# Altium PCB semubot_lidar_driver.PcbDoc (part 2 of 2)
Units mm, origin at the board's own origin, x right, y up, seen from the top; angles counter-clockwise.
Board outline 115 x 110 mm, 4 copper layers (Top Layer, Inner 1, Inner 2, Bottom Layer), stack 1.564 mm thick; 114 components, 69 nets, 444 pads, 478 vias.
Unrouted connection lines stored in the file: 2.
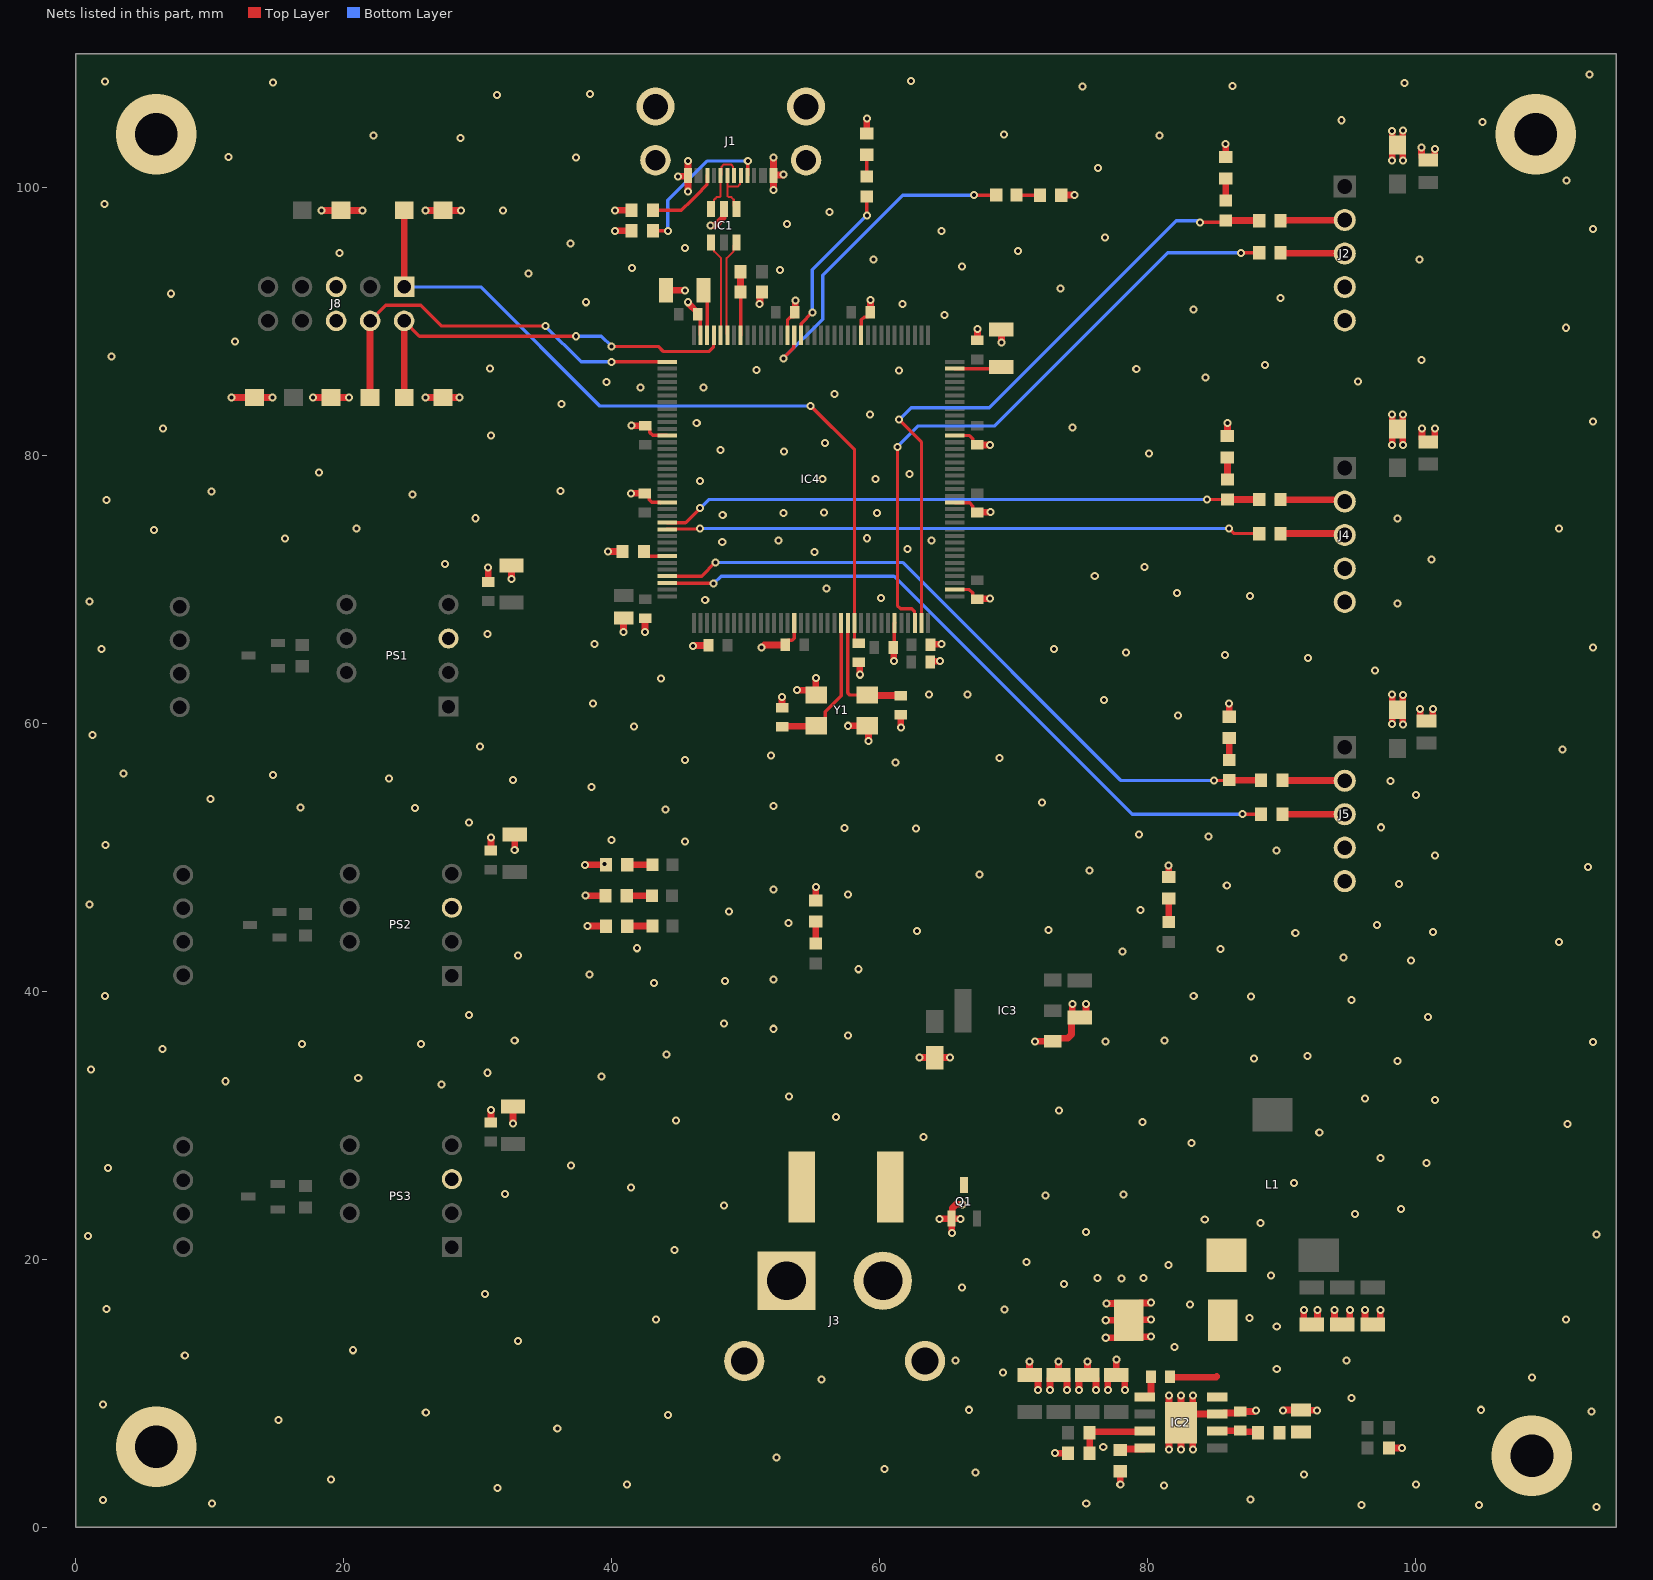
[diagram p4: the nets of this part, all layers, seen from the top]

## Via types
v1: diameter 0.6, hole 0.3, Top Layer to Bottom Layer, tented both sides, 474 vias
v2: diameter 6, hole 3.2, Top Layer to Bottom Layer, 4 vias

## Nets (pads, with @x,y where several pads share a name; then routed paths per layer and width w, separated by ;. In a path a pad name is that pad's centre, name@x,y a point inside that pad or via, vN(x,y) a via of type N, cw(c..) or ccw(c..) an arc to the next point about the centre after c; other vN are vias at no path point) (continued)
GND: C1.1 C2.1 C4.1 C5.1 C6.1 C7.1 C8.1 C9.1 C10.1 C11.1 C12.2 C13.1 C14.1 C15.1 C16.1 C17.1 C18.1 C19.1 C20.1 C21.1 C22.1 C23.1 C24.1 C25.1 C26.1 C27.1 C28.1 C29.1 C30.1 C31.1 C32.1 C33.1 C34.1 C35.1 C36.1 C37.1 C38.1 C39.1 C40.1 C41.1 C42.1 D1.1 D2.1 D3.2 D4.1 D8.1 D9.1 D10.1 D11.1 D12.1 IC1.2 IC2.7 IC2.9 IC3.1 IC4.16 IC4.31 IC4.38 IC4.51 IC4.61 IC4.83 IC4.94 IC4.107 IC4.120 IC4.130 J1.A1 J1.A12 J1.MH1 J1.MH2 J1.MH3 J1.MH4 J2.4 J2.5 J3.2 J3.MH1 J3.MH2 J4.4 J4.5 J5.4 J5.5 J8.5 J8.6 PS1.3 PS2.3 PS3.3 Q1.1 R3.1 R4.1 R11.1 R13.1 R14.1 R15.2 R16.2 R17.2 R18.2 R20.2 R21.2 R22.2 R23.2 R25.2 R26.2 R28.1 R30.1 Y1.2 Y1.4 | length 187.9
  Top Layer w0.25: C30.1@42.58,77.187 42.82,76.947 42.82,76.712 43.003,76.529 43.609,76.529 IC4.130@43.651,76.486 ; C29.1@42.617,82.229 42.857,81.989 42.857,81.731 43.06,81.529 44.123,81.529 IC4.120@44.148,81.504 ; C33.1@46.43,90.569 46.611,90.388 46.611,89.017 IC4.107@46.636,88.992 ; C31.1@52.956,65.977 53.196,66.217 53.472,66.217 53.636,66.381 IC4.16@53.636,67.516 ; IC4.94@53.136,88.992 53.136,90.145 53.342,90.351 53.561,90.351 53.801,90.591 C32.1@53.801,90.696 ; IC4.83@58.636,88.992 58.636,90.138 58.849,90.351 59.077,90.351 59.317,90.591 C23.1@59.317,90.696 ; C35.1@61.035,65.677 61.111,65.753 61.111,67.491 IC4.31@61.136,67.516 ; v1@61.061,64.687 v1(61.087,64.661) ; IC4.38@65.624,70.004 66.717,70.004 66.965,69.756 66.965,69.525 67.205,69.285 C26.1@67.31,69.285 ; IC4.51@65.624,76.504 65.649,76.479 66.729,76.479 66.965,76.243 66.965,76.002 67.205,75.762 C24.1@67.31,75.762 ; IC4.61@65.624,81.504 66.725,81.504 66.96,81.268 66.96,81.049 67.2,80.809 C25.1@67.305,80.809
  Top Layer w0.5: v1(11.614,84.342) D9.1@13.339,84.342 v1(14.662,84.342) ; v1(17.71,84.342) D12.1@19.054,84.342 v1(20.377,84.342) ; v1(18.345,98.312) D8.1@19.795,98.312 v1(21.393,98.312) ; v1(26.092,84.342) D11.1@27.415,84.342 v1(28.632,84.342) ; v1(26.092,98.312) D10.1@27.415,98.312 v1(28.759,98.312) ; C17.1@30.785,70.578 v1(30.785,71.646) ; C21.1@30.988,30.213 v1(30.988,31.154) ; C19.1@30.988,50.512 30.989,50.513 v1(30.991,51.477) v1(30.991,51.477) ; v1(32.526,70.799) C16.1@32.526,71.808 ; v1(32.639,30.138) C20.1@32.639,31.401 ; v1(32.766,50.564) C18.1@32.766,51.7 ; v1(37.996,49.425) 38.023,49.425 38.06,49.462 R21.2@39.567,49.462 ; v1(38.044,47.148) R22.2@39.53,47.148 ; v1(38.208,44.88) R23.2@39.567,44.88 ; v1(39.717,72.842) 39.72,72.844 40.817,72.844 R28.1@40.82,72.847 ; v1(40.259,96.792) R4.1@41.491,96.792 ; v1(40.259,98.316) R3.1@41.491,98.316 ; v1(40.894,66.82) C22.1@40.894,67.895 ; v1(41.436,77.184) 41.438,77.185 C30.1@42.475,77.187 C30.1@42.475,77.187 ; v1(41.485,82.237) 41.489,82.233 42.508,82.233 C29.1@42.512,82.229 ; v1(42.482,66.838) 42.497,66.853 42.497,67.854 C28.1@42.512,67.869 ; C39.1@44.076,92.347 v1(45.466,92.347) ; v1(44.958,100.856) 44.977,100.875 45.65,100.875 J1.A12@45.695,100.92 ; v1(45.72,91.458) 45.739,91.439 45.739,91.365 46.43,90.674 C33.1@46.43,90.569 ; v1(45.72,99.713) 45.708,99.726 45.708,100.907 J1.A12@45.695,100.92 ; v1(45.72,101.999) 45.708,101.987 45.708,100.933 J1.A12@45.695,100.92 ; v1(46.091,65.804) 46.11,65.823 47.205,65.823 C27.1@47.228,65.847 ; v1(47.371,97.173) 47.39,97.192 47.743,97.192 48.337,97.787 48.337,98.373 IC1.2@48.387,98.423 ; v1(51.054,91.331) 51.073,91.35 51.073,92.074 R30.1@51.219,92.22 ; v1(51.181,65.677) 51.208,65.677 51.403,65.872 C31.1@52.956,65.872 ; v1(52.07,99.84) 52.083,99.853 52.083,100.908 J1.A1@52.095,100.92 ; v1(52.07,102.253) 52.083,102.24 52.083,100.933 J1.A1@52.095,100.92 ; v1(52.705,61.994) 52.716,61.983 52.716,61.194 C41.1@52.727,61.184 ; v1(52.832,100.983) 52.813,100.964 52.139,100.964 J1.A1@52.095,100.92 ; C32.1@53.669,90.696 53.702,90.729 53.702,91.566 v1(53.721,91.585) ; v1(53.848,62.502) 53.867,62.483 54.92,62.483 Y1.4@55.272,62.132 55.245,62.158 v1(55.245,63.391) ; R25.2@55.245,46.804 v1(55.245,47.782) ; v1(57.658,59.835) 57.66,59.833 59.07,59.833 Y1.2@59.072,59.832 59.182,59.721 v1(59.182,58.692) ; C40.1@58.466,64.582 58.528,64.52 58.528,63.664 v1(58.547,63.645) ; R20.2@59.055,104.069 v1(59.055,105.174) ; C23.1@59.317,90.696 59.33,90.709 59.33,91.615 v1(59.343,91.628) ; C35.1@61.035,65.677 61.068,65.644 61.068,64.68 v1(61.087,64.661) ; v1(61.595,59.708) C42.1@61.595,60.649 ; v1(62.992,35.07) 64.106,35.07 C12.2@64.123,35.053 64.14,35.07 v1(65.278,35.07) ; C36.1@63.799,64.595 63.846,64.642 64.497,64.642 v1(64.516,64.661) ; C37.1@63.809,65.872 63.848,65.912 64.624,65.912 v1(64.643,65.931) ; v1(64.498,23.007) 64.514,23.023 65.364,23.023 Q1.1@65.374,23.033 ; v1(65.405,21.953) 65.39,21.968 65.39,23.017 Q1.1@65.374,23.033 ; v1(66.065,23.019) 66.058,23.026 65.381,23.026 Q1.1@65.374,23.033 ; v1(66.2,24.099) 66.198,24.097 65.717,24.097 65.424,23.804 65.424,23.083 Q1.1@65.374,23.033 ; C25.1@67.305,80.809 67.31,80.804 68.24,80.804 v1(68.245,80.798) ; C26.1@67.31,69.285 67.344,69.319 68.249,69.319 v1(68.268,69.338) ; C24.1@67.31,75.762 67.321,75.773 68.278,75.773 v1(68.29,75.785) ; C34.1@67.31,88.612 67.319,88.621 67.319,89.434 v1(67.328,89.443) ; C38.1@69.088,89.412 69.108,89.392 v1(69.108,88.444) ; C9.1@70.847,11.36 C9.1@71.207,11.36 ; v1(71.207,12.383) C9.1@71.207,11.36 ; v1(71.616,36.276) 71.618,36.274 72.932,36.274 IC3.1@72.934,36.272 73.159,36.497 74.039,36.497 74.332,36.79 74.332,37.775 C13.1@74.607,38.05 ; v1(71.842,10.224) 71.842,11.085 71.567,11.36 C9.1@71.207,11.36 ; v1(72.731,10.224) 72.731,11.085 73.006,11.36 C11.1@73.366,11.36 ; v1(73.112,5.525) R13.1@74.09,5.525 ; v1(73.366,12.383) C11.1@73.366,11.36 ; R15.2@73.571,99.459 v1(74.549,99.459) ; v1(74.001,10.224) 74.001,11.085 73.726,11.36 C11.1@73.366,11.36 ; v1(74.396,39.073) 74.396,38.325 C13.1@74.671,38.05 ; v1(74.89,10.224) 74.89,11.085 75.165,11.36 C10.1@75.525,11.36 ; C13.1@74.958,38.05 75.151,38.05 75.426,38.325 v1(75.426,39.07) ; v1(75.525,12.383) C10.1@75.525,11.36 ; v1(76.16,10.224) 76.16,11.085 75.885,11.36 C10.1@75.525,11.36 ; v1(76.895,14.14) 77.779,14.14 78.629,14.99 D3.2@78.629,15.431 ; v1(76.895,15.447) 78.613,15.447 D3.2@78.629,15.431 ; v1(76.934,16.695) 77.779,16.695 D3.2@78.629,15.845 ; v1(77.049,10.224) 77.049,11.085 77.324,11.36 C8.1@77.684,11.36 ; v1(77.684,12.51) C8.1@77.684,11.36 ; R14.1@77.963,4.171 77.971,4.164 77.971,3.182 v1(77.978,3.175) ; v1(78.319,10.224) 78.319,11.085 78.044,11.36 C8.1@77.684,11.36 ; D3.2@78.629,15.881 79.479,16.731 79.929,16.731 79.94,16.742 80.259,16.742 v1(80.279,16.761) ; v1(80.279,14.221) 79.479,14.221 78.629,15.071 D3.2@78.629,15.431 ; v1(80.279,15.491) 78.689,15.491 D3.2@78.629,15.431 ; R26.2@81.597,48.544 v1(81.597,49.395) ; v1(81.621,5.779) 81.621,6.922 IC2.9@82.51,7.811 ; v1(81.621,9.843) 81.621,8.7 IC2.9@82.51,7.811 ; v1(82.51,5.779) IC2.9@82.51,7.811 ; v1(82.51,9.843) IC2.9@82.51,7.811 ; v1(83.399,5.779) 83.399,6.922 IC2.9@82.51,7.811 ; v1(83.399,9.843) 83.399,8.7 83.209,8.51 83.272,8.446 85.66,8.446 85.731,8.518 86.825,8.518 C14.1@86.955,8.648 ; R17.2@85.852,102.291 v1(85.852,103.269) ; R16.2@85.979,81.463 v1(85.979,82.441) ; R18.2@86.106,60.508 v1(86.106,61.486) ; C14.1@86.951,8.631 86.953,8.633 88.004,8.633 88.071,8.7 v1(88.098,8.7) ; v1(90.13,8.7) 90.157,8.7 90.208,8.751 C15.1@91.469,8.751 91.501,8.719 92.651,8.719 v1(92.67,8.7) ; v1(91.686,16.197) 91.686,15.403 91.961,15.128 C4.1@92.262,15.128 92.427,15.128 92.702,15.403 v1(92.702,16.197) ; v1(93.972,16.197) 93.972,15.403 94.273,15.403 C5.1@94.548,15.128 94.84,15.128 95.115,15.403 v1(95.115,16.197) ; v1(96.258,16.197) 96.258,15.403 96.533,15.128 C6.1@96.834,15.128 97.126,15.128 97.401,15.403 v1(97.401,16.197) ; R11.1@98.023,5.887 R11.1@98.042,5.906 v1(99.02,5.906) ; v1(98.256,80.799) 98.256,80.826 98.279,80.848 98.279,81.594 D2.1@98.679,81.994 ; v1(98.257,83.083) 98.277,83.064 98.277,82.736 98.279,82.734 98.279,82.394 D2.1@98.679,81.994 ; v1(98.258,62.185) 98.278,62.166 98.278,61.772 98.279,61.771 98.279,61.431 D4.1@98.679,61.031 ; v1(98.26,102.041) 98.26,102.068 98.279,102.088 98.279,102.795 D1.1@98.679,103.195 ; v1(98.261,59.97) 98.28,59.989 98.28,60.632 D4.1@98.679,61.031 ; v1(98.263,104.256) 98.282,104.237 98.282,103.592 D1.1@98.679,103.195 ; 99.08,102.349 99.08,102.044 v1(99.099,102.025) ; 99.079,102.349 99.079,102.795 D1.1@98.679,103.195 ; v1(99.092,104.287) 99.073,104.268 99.073,103.589 D1.1@98.679,103.195 ; v1(99.093,83.073) 99.074,83.053 99.074,82.389 D2.1@98.679,81.994 ; v1(99.096,62.14) 99.076,62.121 99.076,61.428 D4.1@98.679,61.031 ; v1(99.095,80.811) 99.076,80.83 99.076,81.597 D2.1@98.679,81.994 ; v1(99.098,59.941) 99.098,59.968 99.079,59.987 99.079,60.631 D4.1@98.679,61.031 ; v1(100.355,61.08) 100.374,61.06 100.374,60.432 100.403,60.432 100.638,60.197 C7.1@100.848,60.197 101.08,60.197 101.315,60.432 101.315,61.07 v1(101.335,61.089) ; v1(100.457,103.015) 100.476,102.996 100.476,102.556 100.48,102.552 100.48,102.302 100.715,102.067 C1.1@100.965,102.067 101.215,102.067 101.45,102.302 101.45,102.552 101.454,102.556 101.454,102.869 v1(101.473,102.888) ; v1(100.504,82.035) 100.504,81.258 100.739,81.023 C2.1@100.975,81.023 101.219,81.023 101.454,81.258 v1@101.454,82.041
  other v1: 113.522,1.509 96.007,1.648 104.775,1.651 10.16,1.778 75.438,1.778 2.032,2.032 87.694,2.065 31.496,2.921 81.244,3.094 41.148,3.175 100.076,3.175 19.05,3.556 91.694,3.937 67.183,4.079 60.361,4.339 52.324,5.207 76.708,5.969 35.941,7.366 15.113,8.001 44.196,8.382 26.123,8.562 113.157,8.636 66.675,8.763 104.902,8.763 2.032,9.144 95.25,9.652 55.684,11.031 108.712,11.176 69.215,11.557 89.662,11.811 65.67,12.425 94.869,12.446 8.128,12.827 20.701,13.208 82.042,13.462 33.009,13.889 89.662,14.986 43.307,15.494 111.252,15.512 87.63,15.621 69.342,16.256 2.286,16.274 83.185,16.637 30.541,17.398 66.167,17.907 73.787,18.161 78.075,18.552 76.287,18.606 79.716,18.606 89.248,18.795 81.58,19.576 70.993,19.812 44.704,20.701 0.889,21.735 113.538,21.862 75.422,22.051 88.433,22.716 84.286,22.959 95.504,23.368 98.933,23.749 48.387,24.003 72.39,24.765 78.203,24.832 32.052,24.86 41.462,25.35 90.949,25.7 2.413,26.815 36.953,27.016 100.838,27.178 97.409,27.559 83.286,28.668 63.283,29.145 92.837,29.464 111.379,30.117 79.642,30.267 44.79,30.361 56.769,30.607 73.406,31.115 101.473,31.877 96.264,31.993 53.258,32.147 27.305,33.038 11.176,33.292 21.082,33.546 39.242,33.643 30.734,33.927 1.143,34.181 98.679,34.798 87.953,34.997 91.948,35.179 44.087,35.284 6.477,35.705 16.891,36.086 25.781,36.086 113.284,36.213 76.89,36.245 81.28,36.322 32.766,36.34 57.658,36.703 52.07,37.211 48.387,37.61 100.965,38.1 29.337,38.245 95.25,39.37 87.757,39.624 2.159,39.642 83.464,39.643 43.18,40.64 48.455,40.773 52.07,40.894 38.354,41.275 58.42,41.656 99.695,42.291 94.661,42.548 33.02,42.69 78.144,42.972 85.471,43.18 41.887,43.224 110.744,43.706 91.045,44.373 101.346,44.45 62.8,44.503 72.606,44.568 97.136,44.958 53.21,45.114 48.768,45.974 79.48,46.067 1.016,46.5 57.658,47.244 52.07,47.625 85.93,47.924 98.806,48.006 67.459,48.738 75.692,49.022 112.903,49.294 39.477,49.506 101.473,50.165 89.644,50.53 2.219,50.934 45.466,51.181 40.005,51.308 84.582,51.562 79.382,51.703 62.735,52.159 57.383,52.184 97.463,52.257 29.337,52.596 44.009,53.569 25.328,53.702 16.764,53.739 52.07,53.848 72.136,54.102 10.033,54.374 100.069,54.667 38.481,55.263 98.147,55.71 32.639,55.771 23.368,55.898 14.732,56.152 3.556,56.279 61.188,57.094 45.466,57.277 68.957,57.436 51.909,57.61 110.998,58.057 30.161,58.271 1.242,59.151 41.671,59.765 82.299,60.602 38.608,61.486 76.751,61.774 63.693,62.176 66.565,62.176 43.688,63.373 96.99,63.962 91.989,64.9 85.815,65.135 78.392,65.291 1.905,65.55 73.025,65.55 113.284,65.677 38.735,65.931 30.734,66.693 98.679,68.979 1.016,69.106 46.99,69.233 60.112,69.377 87.671,69.511 82.201,69.745 56.043,70.093 76.073,71.011 79.798,71.699 27.559,71.9 101.219,72.263 55.164,72.795 62.103,73.043 48.26,73.551 52.451,73.678 63.881,73.678 15.621,73.805 59.07,73.837 5.842,74.44 20.955,74.567 110.744,74.567 98.679,75.311 29.845,75.329 48.296,75.562 52.832,75.71 59.817,75.71 55.848,75.757 2.295,76.701 25.146,77.107 10.119,77.327 36.195,77.361 46.609,78.123 55.753,78.25 59.69,78.25 62.23,78.631 18.161,78.758 80.137,80.155 52.886,80.314 48.133,80.409 55.945,80.932 30.983,81.499 6.52,82.021 101.492,82.041 74.406,82.092 46.355,82.441 113.284,82.568 59.309,83.076 36.251,83.847 56.642,84.6 42.164,85.108 46.863,85.108 39.624,85.489 95.739,85.53 84.331,85.842 61.468,86.378 50.803,86.401 79.173,86.468 30.931,86.507 88.773,86.759 100.457,87.14 2.648,87.401 11.892,88.541 111.252,89.553 64.87,90.516 83.451,90.922 61.722,91.331 38.1,91.458 89.937,91.781 7.112,92.093 73.533,92.474 33.782,93.617 52.578,93.871 41.529,93.998 66.167,94.125 59.563,94.633 100.33,94.633 19.685,95.141 70.358,95.268 45.466,95.522 36.918,95.85 76.835,96.284 64.643,96.792 113.284,96.919 53.086,97.3 56.261,98.189 31.877,98.316 2.131,98.781 111.29,100.532 76.327,101.491 37.338,102.253 11.399,102.316 28.728,103.738 22.225,103.904 80.899,103.904 69.291,103.986 105.029,104.92 94.488,105.047 31.444,106.928 38.384,107.014 75.162,107.578 86.36,107.587 99.187,107.841 14.718,107.877 2.159,107.95 62.357,107.968 113.017,108.476
  other v2: 108.712,5.334 6,6 6,104 109,104
LED_MD: IC4.93 LED1.1 | length 24.9
  Top Layer w0.25: v1(52.832,87.267) 53.611,88.046 53.611,88.967 IC4.93@53.636,88.992 ; v1(67.056,99.459) LED1.1@68.719,99.459
  Bottom Layer w0.25: v1(52.832,87.267) 55.753,90.188 55.753,93.49 61.722,99.459 v1(67.056,99.459)
NetC3_1: C3.1 D3.1 IC2.8 L1.1 | length 3.5
  Top Layer w0.5: C3.1@81.696,11.188 85.125,11.188 85.177,11.24
NetC3_2: C3.2 IC2.1 | length 2
  Top Layer w0.5: IC2.1@79.798,9.716 80.201,9.716 80.276,9.791 C3.2@80.276,11.24
NetC14_2: C14.2 IC2.6 R12.2 | length 3.1
  Top Layer w0.5: IC2.6@85.222,7.176 85.248,7.202 C14.2@86.929,7.202 ; C14.2@86.951,7.211 87.032,7.13 88.177,7.13 R12.2@88.258,7.049
NetC15_2: C15.2 R12.1 | length 0.1
  Top Layer w0.5: R12.1@89.858,7.049 R12.1@89.879,7.07 ; C15.2@91.448,7.07 C15.2@91.469,7.091
NetC38_2: C38.2 IC4.71 | length 3.7
  Top Layer w0.25: IC4.71@65.631,86.496 69.344,86.496 C38.2@69.364,86.516
NetC39_2: C39.2 IC4.106 | length 3.5
  Top Layer w0.25: C39.2@46.856,92.347 47.136,92.067 IC4.106@47.136,88.992
NetC41_2: C41.2 IC4.23 Y1.1 | length 11.1
  Top Layer w0.25: Y1.1@55.272,59.832 55.422,59.832 55.947,60.357 55.947,60.897 57.136,62.086 IC4.23@57.136,67.516
  Top Layer w0.5: C41.2@52.727,59.764 52.761,59.798 55.238,59.798 Y1.1@55.272,59.832
NetC42_2: C42.2 IC4.24 Y1.3 | length 9.3
  Top Layer w0.25: IC4.24@57.636,67.516 57.625,67.505 57.625,62.281 57.774,62.132 Y1.3@59.072,62.132
  Top Layer w0.5: Y1.3@59.072,62.132 59.103,62.1 61.564,62.1 C42.2@61.595,62.069
NetF1_1: F1.1 J3.1
NetF1_2: F1.2 Q1.3
NetIC2_3: IC2.3 R9.1 R13.2 | length 5.7
  Top Layer w0.5: R13.2@75.69,5.525 R9.1@75.69,7.049 ; R9.1@75.693,7.158 75.739,7.113 79.734,7.113 IC2.3@79.798,7.176
NetIC2_4: IC2.4 R14.2 | length 1.9
  Top Layer w0.5: R14.2@77.962,5.904 78.028,5.838 79.73,5.838 IC2.4@79.798,5.906
NetIC4_101: IC4.101 R29.2 R30.2 | length 4.8
  Top Layer w0.25: R30.2@49.619,92.22 49.636,92.203 IC4.101@49.636,88.992
  Top Layer w0.5: R30.2@49.619,92.22 R29.2@49.619,93.744
NetIC4_138: IC4.138 R28.2 | length 1.9
  Top Layer w0.25: R28.2@42.42,72.847 42.42,72.829 42.745,72.504 IC4.138@44.148,72.504
NetJ1_A5: J1.A5 R4.2 | length 11.7
  Top Layer w0.25: R4.2@43.091,96.792 v1(44.196,96.792) ; J1.A5@50.145,100.92 50.155,100.93 50.155,101.989 v1(50.165,101.999)
  Bottom Layer w0.25: v1(44.196,96.792) 44.196,99.078 47.117,101.999 v1(50.165,101.999)
NetJ1_B5: J1.B5 R3.2 | length 5.5
  Top Layer w0.25: R3.2@43.091,98.316 45.201,98.316 45.973,99.088 45.979,99.088 46.345,99.454 46.345,99.46 47.12,100.235 47.12,100.895 J1.B5@47.145,100.92
NetJ2_2: J2.2 R1.2 | length 4.4
  Top Layer w0.5: R1.2@90.335,97.554 90.355,97.574 94.722,97.574 J2.2@94.742,97.594
NetJ2_3: J2.3 R2.2 | length 4.4
  Top Layer w0.5: R2.2@90.335,95.141 90.359,95.118 94.718,95.118 J2.3@94.742,95.094
NetJ4_2: J4.2 R5.2 | length 4.8
  Top Layer w0.5: R5.2@89.954,76.726 89.974,76.706 94.722,76.706 J4.2@94.742,76.686
NetJ4_3: J4.3 R6.2 | length 4.8
  Top Layer w0.5: R6.2@89.954,74.186 J4.3@94.742,74.186
NetJ5_2: J5.2 R8.2 | length 4.7
  Top Layer w0.5: R8.2@90.081,55.771 90.101,55.751 94.722,55.751 J5.2@94.742,55.731
NetJ5_3: J5.3 R10.2 | length 4.7
  Top Layer w0.5: R10.2@90.081,53.231 J5.3@94.742,53.231
NetLED1_2: LED1.2 R15.1 | length 1.8
  Top Layer w0.25: LED1.2@70.219,99.459 R15.1@71.971,99.459
NetLED2_2: LED3.2 R16.1 | length 1.6
  Top Layer w0.5: LED3.2@85.979,78.238 R16.1@85.979,79.863
NetLED3_2: LED2.2 R17.1 | length 1.6
  Top Layer w0.5: LED2.2@85.852,99.066 R17.1@85.852,100.691
NetLED4_2: LED4.2 R18.1 | length 1.6
  Top Layer w0.5: LED4.2@86.106,57.283 R18.1@86.106,58.908
NetLED5_2: LED5.2 R20.1 | length 1.6
  Top Layer w0.25: LED5.2@59.055,100.856 R20.1@59.055,102.469
NetLED6_2: LED6.2 R21.1 | length 1.9
  Top Layer w0.5: R21.1@41.167,49.462 LED6.2@43.046,49.462
NetLED7_2: LED7.2 R22.1 | length 1.9
  Top Layer w0.5: R22.1@41.13,47.148 LED7.2@43.009,47.148
NetLED8_2: LED8.2 R23.1 | length 1.9
  Top Layer w0.5: R23.1@41.167,44.88 LED8.2@43.046,44.88
NetLED9_2: LED9.2 R25.1 | length 1.6
  Top Layer w0.5: LED9.2@55.245,43.579 R25.1@55.245,45.204
NetLED10_2: LED10.2 R26.1 | length 1.8
  Top Layer w0.5: LED10.2@81.597,45.192 R26.1@81.597,46.944
NRST: C40.2 D10.2 IC4.25 J8.1 | length 59
  Top Layer w0.25: v1(54.864,83.711) 58.136,80.439 IC4.25@58.136,67.516 58.136,66.246 58.376,66.006 C40.2@58.42,66.006
  Top Layer w0.5: J8.1@24.507,92.605 24.515,92.613 D10.2@24.515,98.312
  Bottom Layer w0.25: J8.1@24.507,92.605 24.511,92.601 30.226,92.601 39.116,83.711 v1(54.864,83.711)
RX1: IC4.35 LED2.1 R1.1 | length 49
  Top Layer w0.25: v1(61.468,82.695) 63.136,81.027 IC4.35@63.136,67.516 ; v1(83.947,97.427) 85.713,97.427 LED2.1@85.846,97.56
  Top Layer w0.5: LED2.1@85.846,97.56 88.348,97.56 R1.1@88.354,97.554
  Bottom Layer w0.25: v1(61.468,82.695) 62.357,83.584 68.199,83.584 82.169,97.554 83.82,97.554 v1(83.947,97.427)
RX2: IC4.133 LED3.1 R5.1 | length 44.9
  Top Layer w0.25: IC4.133@44.148,75.004 45.522,75.004 v1(46.609,76.091) ; v1(84.455,76.726) 85.967,76.726 LED3.1@85.979,76.738
  Top Layer w0.5: LED3.1@85.979,76.738 85.985,76.732 88.348,76.732 R5.1@88.354,76.726
  Bottom Layer w0.25: v1(46.609,76.091) 47.244,76.726 v1(84.455,76.726)
RX3: IC4.141 LED4.1 R8.1 | length 51.5
  Top Layer w0.25: IC4.141@44.148,71.004 46.729,71.004 v1(47.752,72.027) ; v1(84.963,55.753) 86.076,55.753 LED4.1@86.106,55.783
  Top Layer w0.5: LED4.1@86.106,55.783 86.112,55.777 88.463,55.777 R8.1@88.475,55.765
  Bottom Layer w0.25: v1(47.752,72.027) 61.722,72.027 77.996,55.753 v1(84.963,55.753)
SWCLK: D12.2 IC4.109 J8.4 | length 30.1
  Top Layer w0.25: J8.4@21.967,90.065 23.137,91.235 25.75,91.235 27.305,89.68 v1(35.052,89.68) ; v1(40.005,87.013) 40.01,87.008 44.143,87.008 IC4.109@44.148,87.004
  Top Layer w0.5: D12.2@21.954,84.342 21.96,84.349 21.96,90.059 J8.4@21.967,90.065
  Bottom Layer w0.25: v1(35.052,89.68) 37.719,87.013 v1(40.005,87.013)
SWDIO: D11.2 IC4.105 J8.2 | length 30.8
  Top Layer w0.25: J8.2@24.507,90.065 25.654,88.918 v1(37.338,88.918) ; v1(40.005,88.156) 43.492,88.156 43.873,87.775 47.266,87.775 47.611,88.119 47.611,88.967 IC4.105@47.636,88.992
  Top Layer w0.5: J8.2@24.507,90.065 24.511,90.061 24.511,84.346 D11.2@24.515,84.342
  Bottom Layer w0.25: v1(37.338,88.918) 39.243,88.918 v1(40.005,88.156)
TX1: IC4.34 R2.1 | length 47.2
  Top Layer w0.25: v1(61.341,80.663) 61.341,68.81 61.573,68.578 62.42,68.578 62.611,68.388 62.611,68.251 62.611,67.541 IC4.34@62.636,67.516 ; v1(86.995,95.141) R2.1@88.354,95.141
  Bottom Layer w0.25: v1(61.341,80.663) 62.898,82.22 68.613,82.22 81.534,95.141 v1(86.995,95.141)
TX2: IC4.134 R6.1 | length 44.4
  Top Layer w0.25: IC4.134@44.148,74.504 44.173,74.529 46.571,74.529 v1(46.609,74.567) ; v1(86.106,74.567) 86.487,74.186 R6.1@88.354,74.186
  Bottom Layer w0.25: v1(46.609,74.567) v1(86.106,74.567)
TX3: IC4.142 R10.1 | length 51.9
  Top Layer w0.25: IC4.142@44.148,70.504 44.169,70.482 47.602,70.482 v1(47.623,70.461) ; v1(87.122,53.231) R10.1@88.481,53.231
  Bottom Layer w0.25: v1(47.623,70.461) 48.173,71.011 61.087,71.011 78.867,53.231 v1(87.122,53.231)
USB_D_N: IC1.1 IC1.6 IC4.103 J1.A7 J1.B7 | length 11.9
  Top Layer w0.155: J1.A7@48.645,100.92 48.645,100.092 ; IC4.103@48.675,88.993 48.59,89.078 48.59,94.749 49.115,95.273 49.115,95.701 IC1.6@49.337,95.923 ; IC1.1@49.337,98.423 49.119,98.641 49.119,99.123 48.941,99.301 48.736,99.301 48.645,99.392 48.645,100.092 ; J1.B7@49.645,100.92 49.573,100.848 49.573,100.255 49.41,100.092 48.645,100.092
USB_D_P: IC1.3 IC1.4 IC4.104 J1.A6 J1.B6 | length 12.5
  Top Layer w0.155: IC1.4@47.437,95.923 47.659,95.701 47.659,95.266 48.175,94.75 IC4.104@48.175,88.993 ; IC1.3@47.437,98.423 47.659,98.645 47.659,99.112 47.752,99.205 47.752,99.21 47.843,99.301 48.054,99.301 48.145,99.392 J1.B6@48.145,100.92 48.217,100.992 48.217,101.585 48.38,101.748 48.91,101.748 49.073,101.585 49.073,100.992 J1.A6@49.145,100.92
USBD: IC4.92 LED5.1 | length 12.4
  Top Layer w0.25: IC4.92@54.136,88.992 54.161,89.017 54.161,89.866 v1(54.991,90.696) ; v1(59.055,97.935) LED5.1@59.055,99.356
  Bottom Layer w0.25: v1(54.991,90.696) 54.991,93.871 v1(59.055,97.935)
pads on no net: IC3.2 IC4.1 IC4.2 IC4.3 IC4.4 IC4.5 IC4.7 IC4.8 IC4.9 IC4.10 IC4.11 IC4.12 IC4.13 IC4.14 IC4.15 IC4.20 IC4.21 IC4.22 IC4.26 IC4.27 IC4.28 IC4.29 IC4.36 IC4.37 IC4.40 IC4.41 IC4.42 IC4.43 IC4.44 IC4.45 IC4.46 IC4.47 IC4.48 IC4.49 IC4.50 IC4.53 IC4.54 IC4.55 IC4.56 IC4.57 IC4.58 IC4.59 IC4.60 IC4.63 IC4.64 IC4.65 IC4.66 IC4.67 IC4.68 IC4.69 IC4.70 IC4.73 IC4.74 IC4.75 IC4.76 IC4.77 IC4.78 IC4.79 IC4.80 IC4.81 IC4.82 IC4.85 IC4.86 IC4.87 IC4.88 IC4.96 IC4.97 IC4.98 IC4.99 IC4.100 IC4.102 IC4.110 IC4.111 IC4.112 IC4.113 IC4.114 IC4.115 IC4.116 IC4.117 IC4.118 IC4.119 IC4.122 IC4.123 IC4.124 IC4.125 IC4.126 IC4.127 IC4.128 IC4.129 IC4.132 IC4.137 J1.A8 J1.B8 J6.1 J7.1 J8.3 J8.9 J8.10 J9.1 L1.3

## Polygon pours and split planes (outlines as drawn)
+3V3 on Top Layer "+3V3_L01_P024" (solid, pour order 24): 39.116,39.721 56.478,39.724 59.784,41.57 63.488,41.615 63.488,36.403 59.784,36.418 56.478,38.264 39.116,38.118 36.063,36.668 36.063,38.171 36.063,41.7
NetC3_1 on Top Layer "NETC3_1_L01_P006" (solid, pour order 6): 84.482,9.382 84.482,21.397 87.376,21.397 87.339,19.088 86.701,9.382
NetF1_1 on Top Layer "NETF1_1_L01_P040" (solid, pour order 40): 50.9,20.499 51.712,24.374 53.062,28.099 55.2,28.099 55.2,20.499
+5V on Top Layer "+5V_L01_P008" (solid, pour order 8): 97.182,21.665 99.919,23.295 101.923,24.836 102.461,26.944 102.362,100.921 103.003,100.921 104.357,100.778 105.401,100.614 106.386,100.284 107.287,99.694 107.923,99.277 108.693,98.7 109.398,98.091 109.855,97.409 109.855,27.98 109.666,24.585 108.773,21.44 107.665,19.696 105.951,18.505 103.588,17.755 100.487,17.4 91.4,17.411 91.4,21.599
+5V on Top Layer "+5V_L01_P042" (solid, pour order 42): 102.435,42.789 102.015,42.358 101.574,42.008 101.5,41.934 101.405,41.874 101.178,41.753 100.622,41.501 100.2,41.399 72.3,41.299 72.3,40.399 72.4,40.299 100.2,40.299 100.809,40.213 101.093,40.031 101.574,39.723 102.015,39.37 102.476,38.82 104.4,38.799 104.4,40.399 104.4,42.799
+12V on Top Layer "+12V_L01_P041" (solid, pour order 41): 66.982,23.608 66.982,10.597 67.154,10.079 67.451,9.636 68.118,8.98 68.795,8.527 69.394,8.184 70.282,8.037 70.482,8.037 70.482,9.071 70.282,9.071 69.465,9.505 68.795,9.911 68.305,10.412 68.155,10.625 68.118,10.852 68.02,11.454 68.053,23.205 67.608,23.608
NetF1_2 on Top Layer "NETF1_2_L01_P001" (solid, pour order 1): 66.524,26.124 66.524,24.946 66.529,24.941 61.7,22.799 61.791,28.039
+12V on Top Layer "+12V_L01_P003" (solid, pour order 3): 77.176,9.081 77.176,8.065 70.318,8.065 70.318,9.081
+12V on Top Layer "+12V_L01_P004" (solid, pour order 4): 79.713,8.758 79.713,8.134 76.898,8.134 76.898,8.747 76.92,8.769
NetC15_2 on Top Layer "NETC15_2_L01_P005" (solid, pour order 5): 89.834,7.54 89.84,7.535 91.178,7.535 91.178,6.625 91.173,6.63 89.834,6.63
GND on Top Layer "GND_L01_P033" (solid, pour order 33): 75.525,19.368 75.525,13.653 80.605,13.653 80.605,19.368
+3V3 on Top Layer "+3V3_L01_P021" (solid, pour order 21): 35.306,29.122 28.067,29.122 28.067,27.979 28.194,28.106 35.306,28.13
+3V3 on Top Layer "+3V3_L01_P025" (solid, pour order 25): 34.925,69.552 36.523,69.106 36.523,28.564 35.91,28.13 34.925,28.13
+5V on Top Layer "+5V_L01_P012" (solid, pour order 12): 94.923,100.918 94.926,100.921 102.743,100.921 102.743,99.316 94.94,99.316
+5V on Top Layer "+5V_L01_P011" (solid, pour order 11): 93.974,79.856 103.747,79.856 103.747,78.387 103.747,76.091 93.991,78.251
+3V3 on Top Layer "+3V3_L01_P039" (solid, pour order 39): 67.806,36.276 67.679,36.403 59.69,36.403 59.69,41.61 67.806,41.61
+5V on Top Layer "+5V_L01_P010" (solid, pour order 10): 95.116,58.939 95.223,59.046 103.378,59.046 103.378,57.576 103.251,55.009 95.116,57.422
+3V3 on Top Layer "+3V3_L01_P031" (solid, pour order 31): 33.528,29.101 34.962,29.51 35.079,29.393 35.306,29.101
+3V3 on Top Layer "+3V3_L01_P030" (solid, pour order 30): 34.324,49.451 34.925,49.675 35.042,49.558 35.042,49.451
+3V3 on Top Layer "+3V3_L01_P029" (solid, pour order 29): 35.03,68.068 34.268,68.603 33.563,68.603 33.563,69.552 34.931,69.552
+3V3 on Top Layer "+3V3_L01_P028" (solid, pour order 28): 35.033,47.861 34.271,48.396 33.567,48.396 33.567,49.412 33.605,49.451 35.042,49.451
+3V3 on Top Layer "+3V3_L01_P027" (solid, pour order 27): 34.971,67.788 33.96,68.498 33.255,68.498 33.255,69.514 33.293,69.552 34.981,69.552
+3V3 on Top Layer "+3V3_L01_P023" (solid, pour order 23): 33.255,69.514 27.921,69.514 27.921,68.371 28.048,68.498 33.255,68.498
+3V3 on Top Layer "+3V3_L01_P022" (solid, pour order 22): 33.401,49.421 28.067,49.421 28.067,48.278 28.194,48.405 33.401,48.405
CANG2 on Bottom Layer "CANG2_L04_P034" (solid, pour order 34): 4.319,51.333 24.892,51.333 24.892,38.252 4.319,38.252
GND on Bottom Layer "GND_L04_P036" (solid, pour order 36): 0,110 0,-39.987 120.015,-39.987 120.015,110
CANG3 on Bottom Layer "CANG3_L04_P037" (solid, pour order 37): 4.318,31.133 25.146,31.133 25.146,18.052 4.318,18.052
CANG1 on Bottom Layer "CANG1_L04_P038" (solid, pour order 38): 4.098,71.47 24.384,71.47 24.384,58.389 4.098,58.389
GND on Inner 2 (split plane): 114.49,0.51 0.51,0.51 0.51,109.49 114.49,109.49
GND on Inner 2 (split plane): 24.394,58.428 4.054,58.428 4.054,71.402 24.394,71.402
CANG3 on Inner 2 (split plane): 25.283,18.042 4.308,18.042 4.308,31.143 25.283,31.143
CANG2 on Inner 2 (split plane): 24.902,38.235 4.308,38.235 4.308,51.463 24.902,51.463
GND on Inner 1 (split plane): 114.49,0.51 0.51,0.51 0.51,109.49 114.49,109.49
CANG1 on Inner 1 (split plane): 24.394,58.428 4.054,58.428 4.054,71.402 24.394,71.402
CANG3 on Inner 1 (split plane): 25.283,18.042 4.308,18.042 4.308,31.143 25.283,31.143
CANG2 on Inner 1 (split plane): 24.902,38.235 4.308,38.235 4.308,51.463 24.902,51.463

## Other copper
Bottom Layer:
  pour cut-out: 62.599,42.118 62.599,36.149 68.187,36.149 68.187,41.991 68.06,42.118
  pour cut-out: 3.102,31.194 3.102,17.94 4.225,17.94 4.225,31.163 4.191,31.197
  pour cut-out: 2.667,51.45 2.667,38.252 2.723,38.196 4.352,38.196 4.352,51.419 4.318,51.453
  pour cut-out: 2.413,71.643 2.413,58.445 2.469,58.389 4.098,58.389 4.098,71.612 4.064,71.646
  pour cut-out: 2.413,73.17 2.413,57.041 2.413,73.17 25.781,73.17 2.413,73.17 2.413,57.041 25.781,57.041 25.781,58.438 25.774,58.445 2.413,58.445 2.413,71.643 3.813,71.652 24.42,71.652 24.384,71.616 24.384,58.445 25.774,58.445 25.781,58.438 25.781,73.17
  pour cut-out: 3.302,32.657 26.67,32.657 3.048,32.657 3.048,16.528 26.67,16.528 26.67,17.925 26.663,17.932 3.302,17.932 3.302,31.13 4.702,31.139 25.309,31.139 25.273,31.103 25.273,17.932 26.663,17.932 26.67,17.925 26.67,32.657
  pour cut-out: 2.921,52.977 2.921,36.848 2.921,52.977 26.289,52.977 2.921,52.977 2.921,36.848 26.289,36.848 26.289,38.245 26.282,38.252 2.921,38.252 2.921,51.45 4.321,51.459 24.928,51.459 24.892,51.423 24.892,38.252 26.282,38.252 26.289,38.245 26.289,52.977
Inner 1 (plane layer: these items are gaps in the copper):
  lines w1.5: 3.302,57.676 25.146,57.676 25.146,72.154 3.302,72.154 3.302,57.676 ; 3.556,17.29 26.035,17.29 26.035,31.895 3.556,31.895 3.556,17.29 ; 3.556,37.483 25.654,37.483 25.654,52.215 3.556,52.215 3.556,37.483
Inner 2 (plane layer: these items are gaps in the copper):
  lines w1.5: 3.302,57.676 25.146,57.676 25.146,72.154 3.302,72.154 3.302,57.676 ; 3.556,17.29 26.035,17.29 26.035,31.895 3.556,31.895 3.556,17.29 ; 3.556,37.483 25.654,37.483 25.654,52.215 3.556,52.215 3.556,37.483

## Silkscreen, mask and mechanical layers (free items; w line width, h text height)
Top Overlay:
  text "RX1" at 79.883,96.647 h1.52
  text "MD" at 66.675,95.758 h1.52
  text "USBD" at 56.769,95.504 h1.52
  text "RX2" at 80.01,75.946 h1.52
  text "RX3" at 80.264,54.991 h1.52
  text "CAN1" at 47.117,48.895 h1.52
  text "CAN2" at 46.99,46.736 h1.52
  text "CAN3" at 46.99,44.323 h1.52
  text "+5V" at 83.312,43.434 h1.52
  text "+3V3" at 56.769,41.656 h1.52
  text "SEMUBOT LIDAR DRIVER" at 11.176,5.461 h1.52
Mechanical 1:
  the board outline again, w0.254